# Altium PCB Mach_IO.PcbDoc (part 1 of 2)
Units mil, origin at the board's own origin, x right, y up, seen from the top; angles counter-clockwise.
Board outline 4965 x 4380 mil, 4 copper layers (Top Layer, Int1 (GND), Int2 (PWR), Bottom Layer), stack 53.912 mil thick; 148 components, 136 nets, 543 pads, 238 vias.
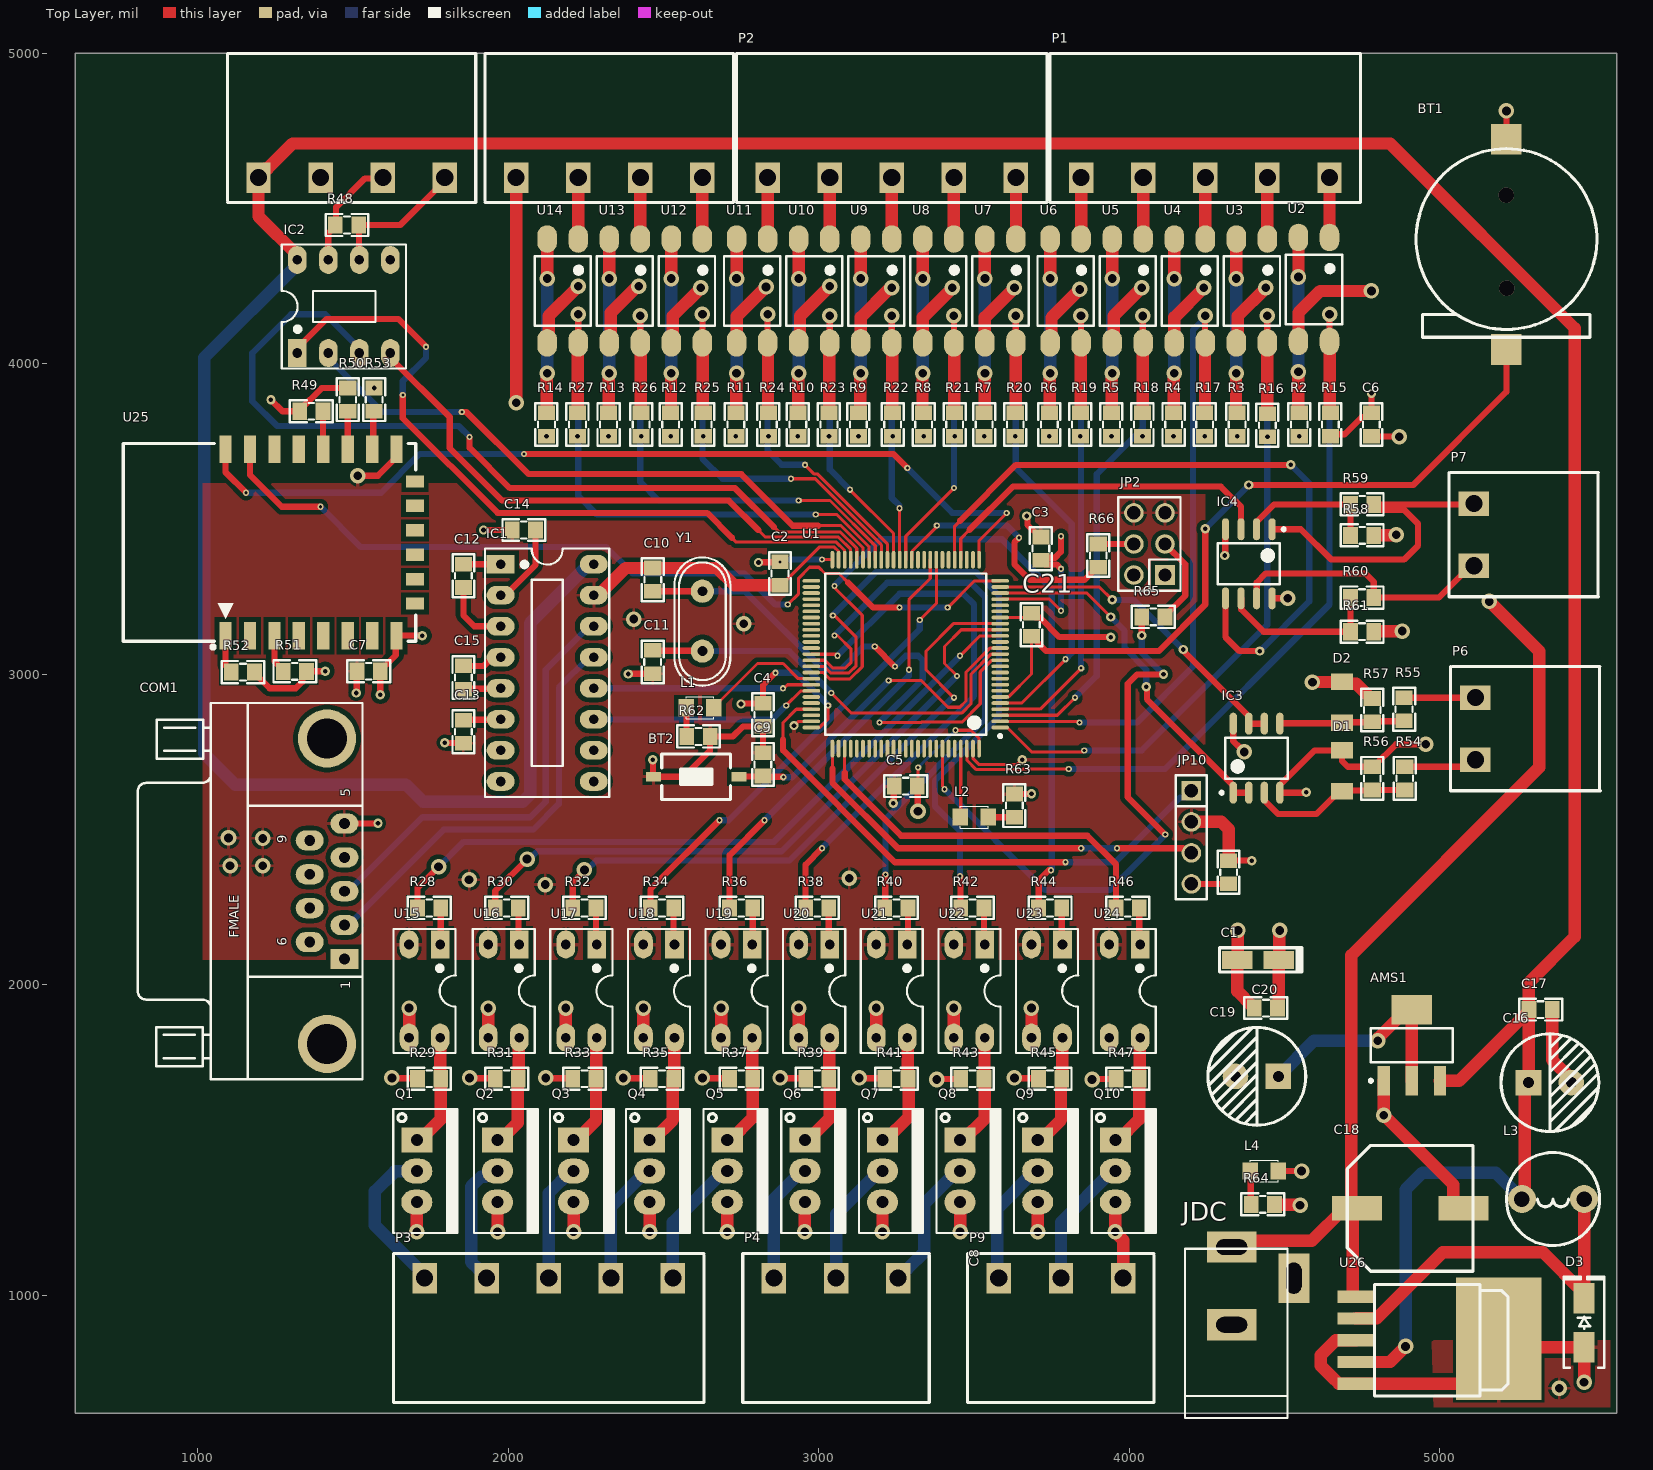
[diagram p0: Top Layer view]
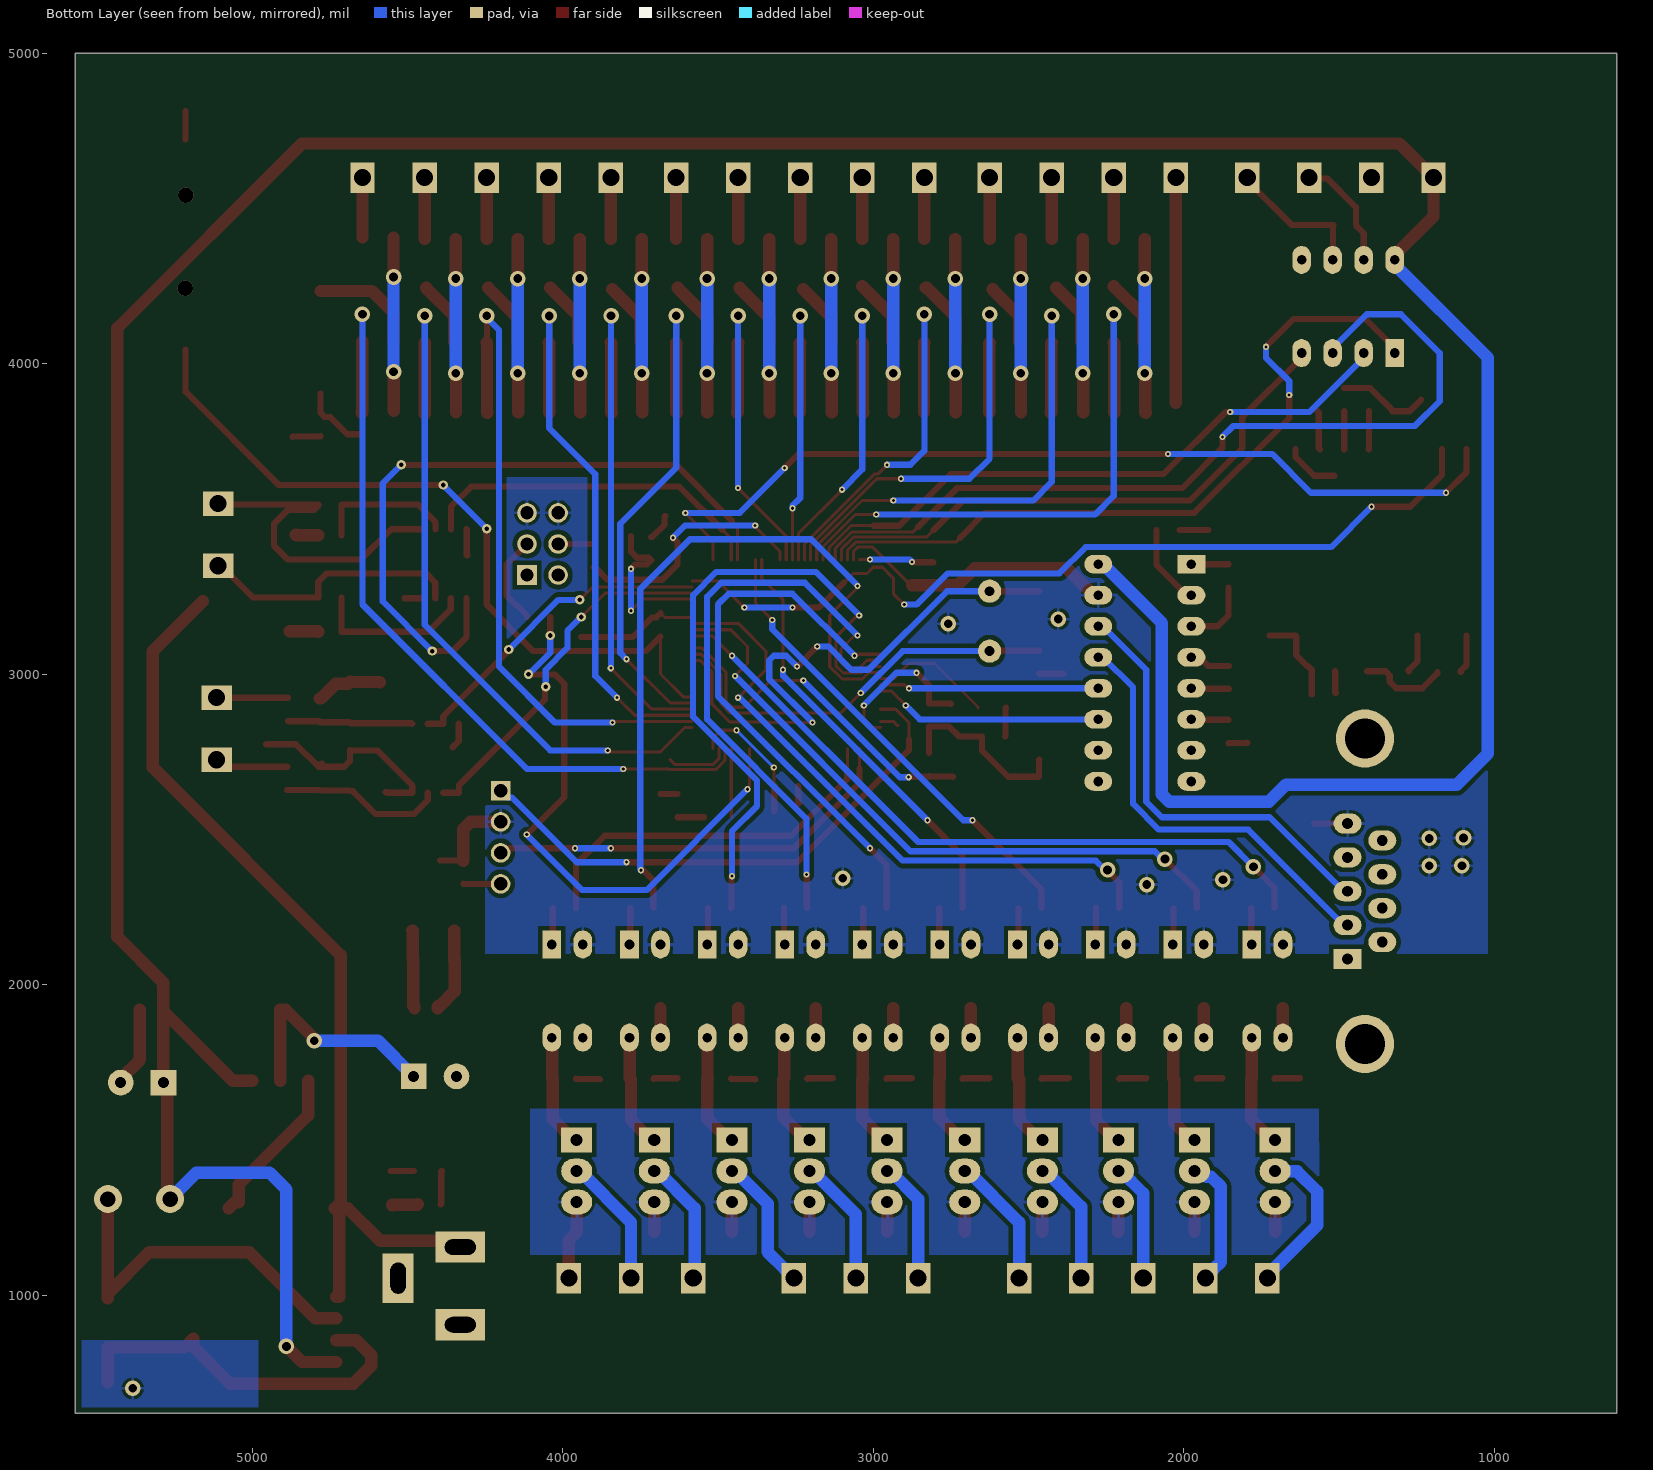
[diagram p1: Bottom Layer view, seen from below]
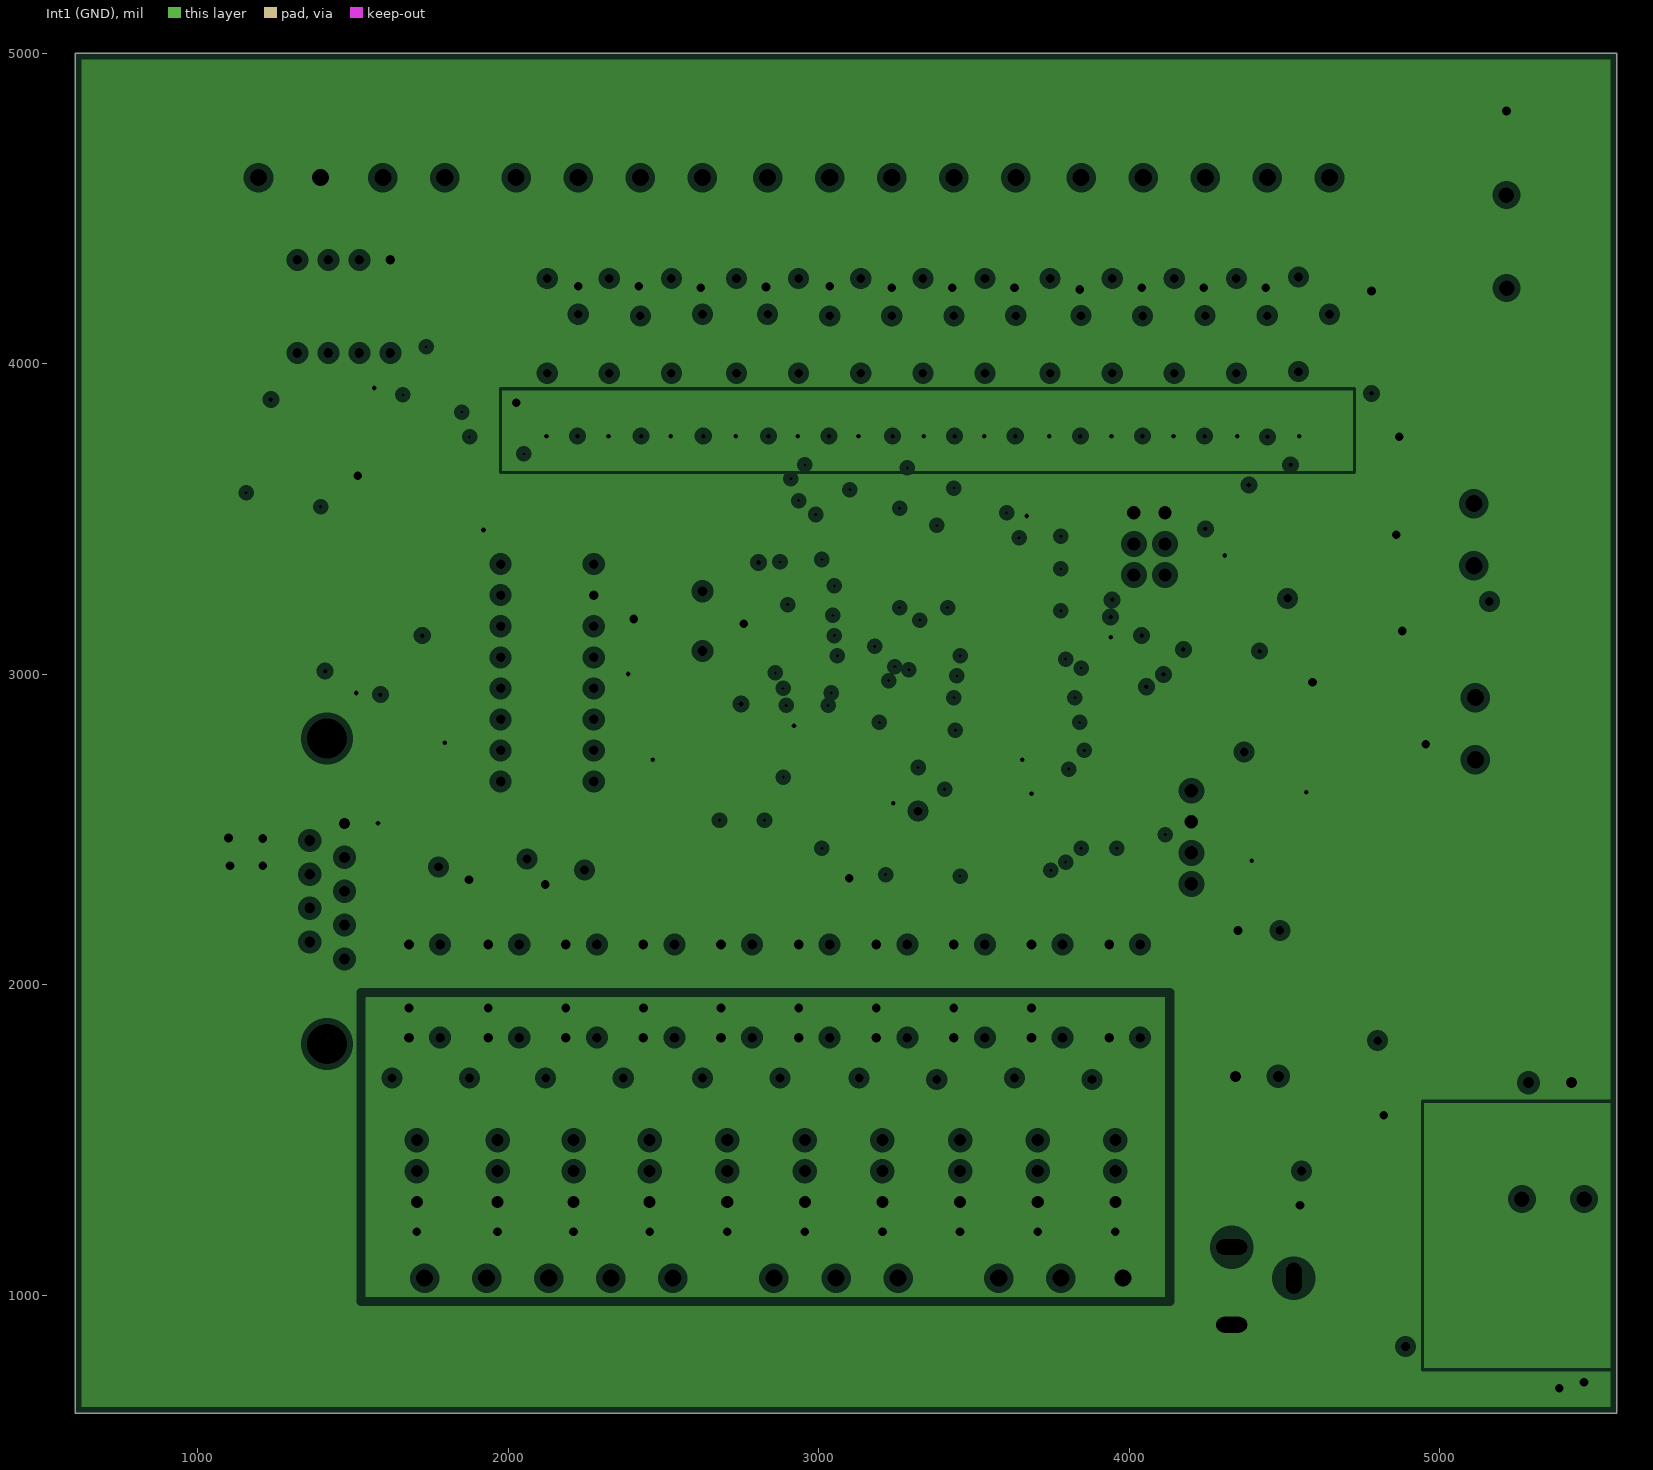
[diagram p2: Int1 (GND), clearances drawn from the general rule]
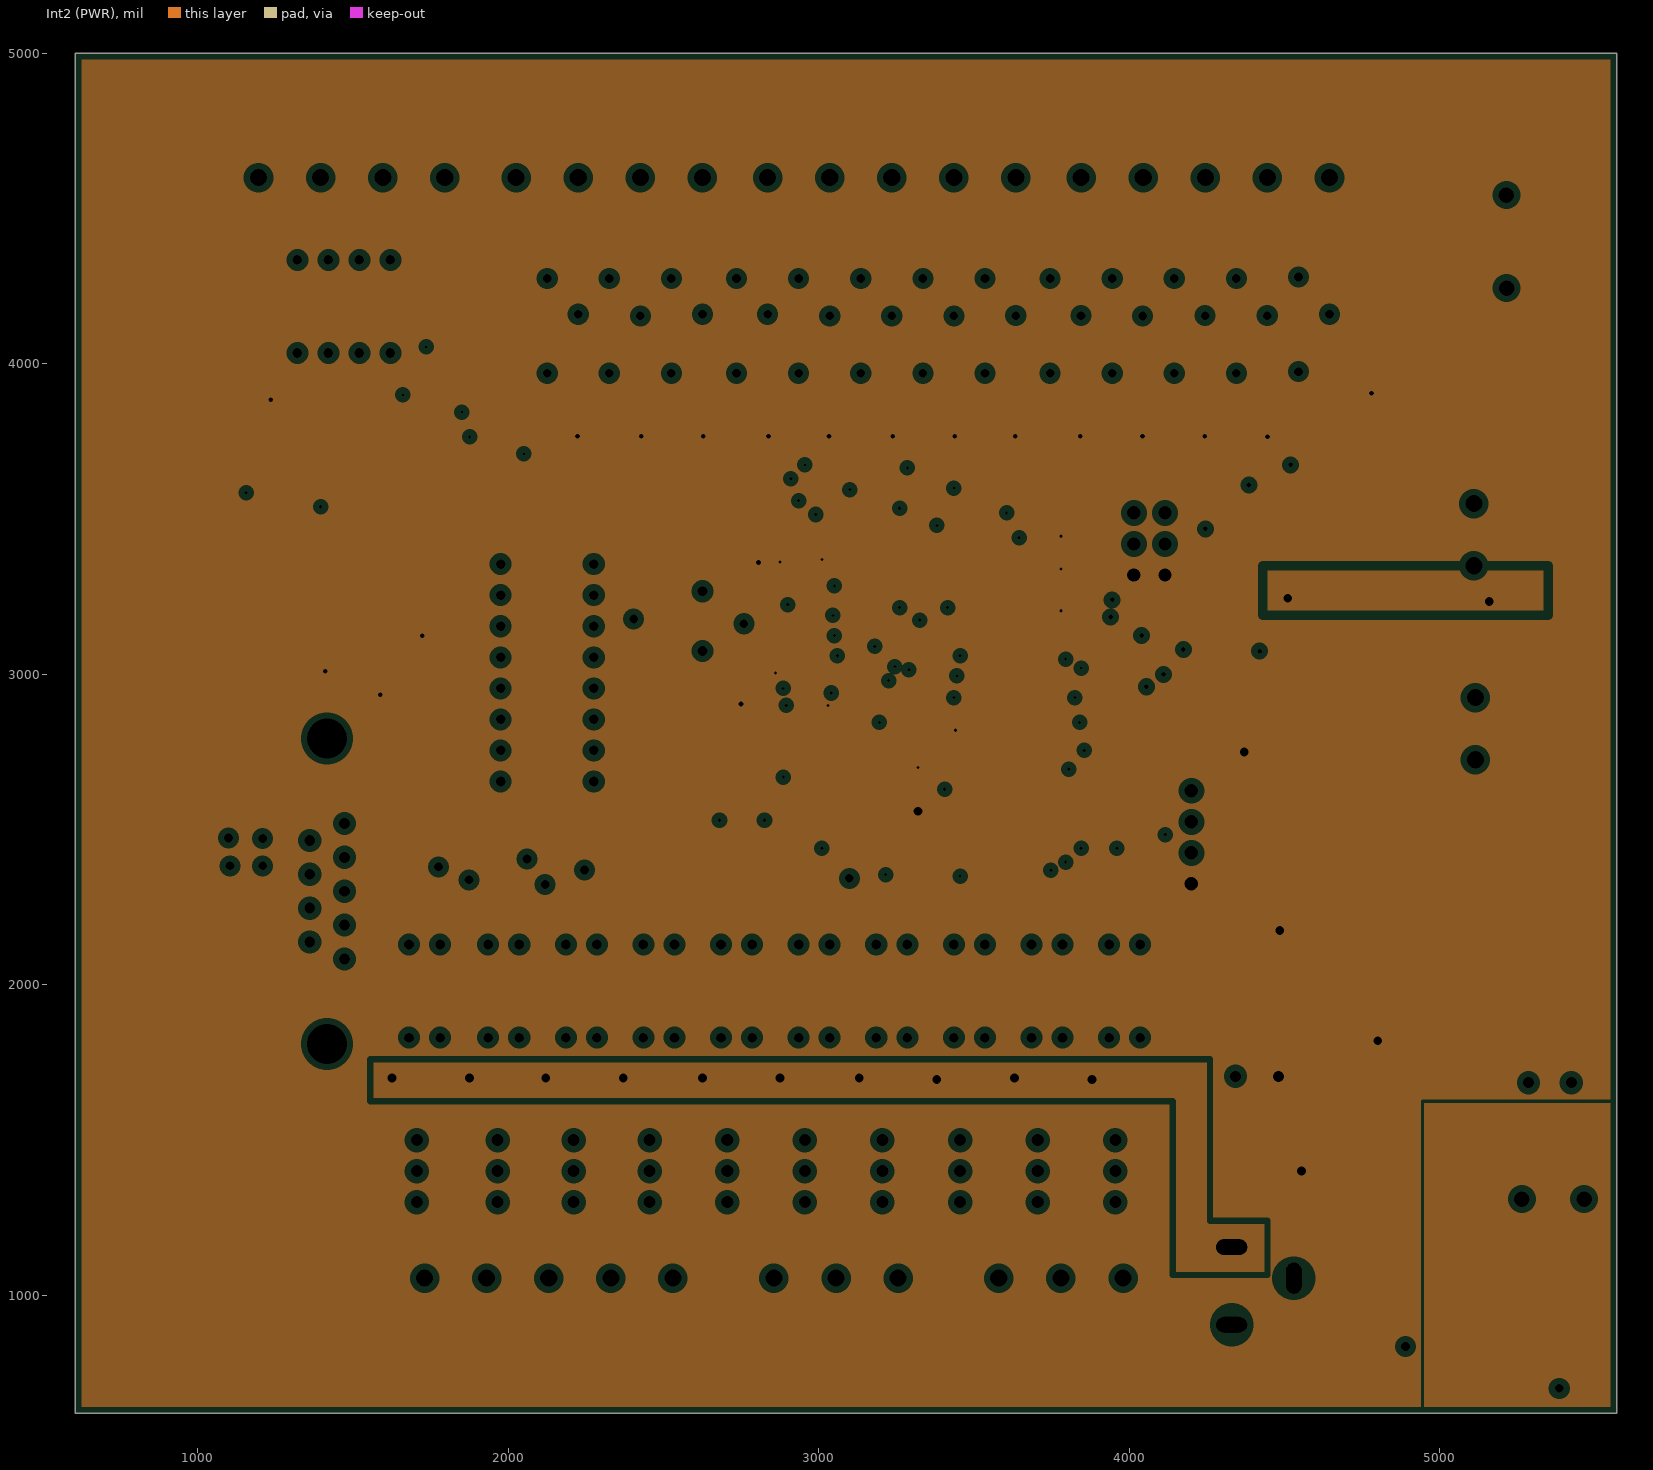
[diagram p3: Int2 (PWR), clearances drawn from the general rule]

## Layer stack, top to bottom
Top Solder: solder mask 1, SM-001, Dk 4
Top Layer: signal copper 1.378
Dielectric 1: prepreg 5.1, PP-017, Dk 4.3
Dielectric 2: prepreg 5.1, PP-017, Dk 4.3
Int1 (GND): plane copper 1.378, net (Multiple Nets)
Dielectric 3: core 28, Core-039, Dk 4.8
Int2 (PWR): plane copper 1.378, net (Multiple Nets)
Dielectric 4: prepreg 5.1, PP-017, Dk 4.3
Dielectric 5: prepreg 5.1, PP-017, Dk 4.3
Bottom Layer: signal copper 1.378
Bottom Solder: solder mask 1, SM-001, Dk 4

## Board outline
605,620 5570,620 5570,5000 605,5000

## Design rules (kind name [scope] priority, off if disabled: settings)
Clearance polygon [InPolygon] p1: gap=15 ignorepadtopadclearanceinfootprint=FALSE
Clearance Clearance_2 [InNet('24V')] p2: gap=20 ignorepadtopadclearanceinfootprint=FALSE
Clearance Clearance_1 [InNet('5V')] p3: gap=10 ignorepadtopadclearanceinfootprint=FALSE
Clearance [All] p4: gap=6 ignorepadtopadclearanceinfootprint=FALSE
DiffPairsRouting [All] p1: maxlimit=5 minlimit=5 mostfreqgap=5 toplayer_minwidth=85.07 toplayer_maxwidth=85.07 toplayer_prefwidth=85.07 bottomlayer_minwidth=85.07 bottomlayer_maxwidth=85.07 bottomlayer_prefwidth=85.07 impedanceprofiledriven=TRUE impedanceprofileid={BD4F8BAC-E991-4E81-AAFB-73A4E41C6E87} impedanceprofilevalue=30.000000 maxuncoupledlength=500
HoleSize [All] p1: absolutevalues=TRUE maxlimit=200 minlimit=1 maxpercent=80.000 minpercent=20.000
MinimumSolderMaskSliver [All] p1: minsoldermaskwidth=4
PlaneClearance [All] p1: clearance=20
PlaneConnect [All] p1: planeconnectstyle=Relief reliefexpansion=20 reliefentries=4 reliefconductorwidth=10 reliefairgap=10
PolygonConnect [All] p1: connectstyle=Relief reliefconductorwidth=10 reliefentries=4 polygonreliefangle="90 Angle" airgapwidth=10
RoutingVias [InDifferentialPairClass('All Differential Pairs')] p1: holewidth=28 width=50 viastyle="Through Hole" minholewidth=28 minwidth=50 maxholewidth=28 maxwidth=50
SilkToSilkClearance [All] p1: silktosilkclearance=0
SilkToSolderMaskClearance [IsPad] p1: minsilkscreentomaskgap=0 clearancetoexposedcopper=TRUE
SolderMaskExpansion [All] p1: expansion=4 istentingtop=FALSE
Width Width_1 [InNet('5V')] p1: maxlimit=60 minlimit=20 preferedwidth=40
Width [All] p2: maxlimit=40 minlimit=10 preferedwidth=20
23 further rules are at their usual default settings.

## Classes and differential pairs
component class U_RS485: IC2 R48
component class U_RS232: C12 C13 C14 C15 COM1 IC1
component class U_Regulator: AMS1 C16 C17 C18 C19 C20 D3 JDC L3 L4 R64 U26
component class U_esp8266: R49 R50 R51 R52 R53 U25
component class U_D_output: P3 P4 P9 Q1 Q2 Q3 Q4 Q5 Q6 Q7 Q8 Q9 Q10 R28 R29 R30 R31 R32 R33 R34 R35 R36 R37 R38 R39 R40 R41 R42 R43 R44 R45 R46 R47 U15 U16 U17 U18 U19 U20 U21 U22 U23 U24
component class U_D_Input: P1 P2 R2 R3 R4 R5 R6 R7 R8 R9 R10 R11 R12 R13 R14 R15 R16 R17 R18 R19 R20 R21 R22 R23 R24 R25 R26 R27 U2 U3 U4 U5 U6 U7 U8 U9 U10 U11 U12 U13 U14
component class U_A_output: IC4 P7 R58 R59 R60 R61
component class U_A_Input: D1 D2 IC3 P6 R54 R55 R56 R57
component class Mach_IO: BT1 BT2 C1 C2 C3 C4 C5 C6 C7 C8 C9 C10 C11 C21 JP2 JP10 L1 L2 R62 R63 R65 R66 U1 Y1

## Components (designator, comment, footprint, x,y, rotation, side; value= is the part's Value field where it differs from the comment)
AMS1 "AMS1117-3.3V" SOT223 4910,1805 r0 top value="AMS1117-3.3V SOT223"
BT1 "CR1220 SMD" "DE PIN CR1220" 5215,4385 r0 top
BT2 "Nut Nhan 2 Chan SMD 3x6x2.5" "Nut Nhan 2 Chan SMD 3x6x2.5" 2605,2670 r0 top
C1 "10uF" "tu tantalum smd3216" 4415,2080 r180 top
C2 "104" "tu 0805" 2875,3325 r270 top
C3 "104" "tu 0805" 3715,3405 r90 top
C4 "104" "tu 0805" 2820,2870 r270 top
C5 "104" "tu 0805" 3280,2640 r180 top
C6 "104" "tu 0805" 4780,3805 r270 top
C7 "104" "tu 0805" 1550,3010 r180 top
C8 "104" "tu 0805" 4319.87,2362.43 r90 top
C9 "104" "tu 0805" 2820,2710 r270 top
C10 "22pF" "tu 0805" 2465,3305 r90 top
C11 "22pF" "tu 0805" 2465,3040 r270 top
C12 "104" "tu 0805" 1855.13,3317.57 r270 top
C13 "104" "tu 0805" 1855,2815 r90 top
C14 "104" "tu 0805" 2050,3465 r180 top
C15 "104" "tu 0805" 1855,2990 r270 top
C16 "470uF" "tu hoa 8mm" 5355,1685 r0 top
C17 "106" "tu 0805" 5325,1920 r180 top
C18 "330uF" "tu nhom 10 (g)" 4905,1280 r0 top
C19 "470uF" "tu hoa 8mm" 4411.1,1705 r180 top
C20 "106" "tu 0805" 4440,1925 r0 top
C21 "104" "tu 0805" 3685,3160 r270 top
COM1 "COM 9 FMALE" "DSB 9-F" 1415.91,2301.42 r90 top value="COM 9"
D1 "3.3V" "DIODE ZENNER SMD SOD80" 4685,2690 r90 top
D2 "3.3V" "DIODE ZENNER SMD SOD80" 4685,2910 r90 top
D3 "SS34" "DIODE SMA" 5465,911.26 r90 top
IC1 "MAX232" DIP16/W0.3 1975,3355 r270 top
IC2 "MAX485" DIP8/W0.3 1320,4035 r0 top
IC3 "LM358 SOP8" "SOP 8" 4410,2730 r90 top
IC4 "LM358 SOP8" "SOP 8" 4385,3356.22 r270 top
JDC "Jac DC" DC-IN 4430,1030 r90 top
JP2 "JP 2x3 2.54" "JP 2x3 DT" 4065,3420 r90 top
JP10 "JP 1x4 2.54" "JP 1x4 DT" 4200,2625 r270 top
L1 "LED 0805" LED-0805-Red 2662.23,2892.39 r180 top
L2 "LED 0805" LED-0805-Green 3455,2540 r0 top
L3 "100uH 3A" "CUON CAM 100uH3A" 5365,1310 r180 top
L4 "LED 0805" LED-0805-Orange 4480,1400 r180 top
P1 "CON 5 EDG5.08" "CON 5 5EDG5.08" 3845,4600 r0 top
P2 "CON 5 EDG5.08" "CON 5 5EDG5.08" 2835,4600 r0 top
P3 "CON 5 EDG5.08" "CON 5 5EDG5.08" 2530,1055 r180 top
P4 "CON 3 EDG5.08" "CON 3 3EDG5.08" 3255.5,1055 r180 top
P6 "CON 2 EDG5.08" "CON 2 2EDG5.08" 5115,2925 r270 top
P7 "CON 2 EDG5.08" "CON 2 2EDG5.08" 5110,3550 r270 top
P9 "CON 3 EDG5.08" "CON 3 3EDG5.08" 3980,1055 r180 top
Q1 "IRFZ44" TO220 1705,1500 r270 top
Q2 "IRFZ44" TO220 1965,1500 r270 top
Q3 "IRFZ44" TO220 2210,1500 r270 top
Q4 "IRFZ44" TO220 2455,1500 r270 top
Q5 "IRFZ44" TO220 2705,1500 r270 top
Q6 "IRFZ44" TO220 2955,1500 r270 top
Q7 "IRFZ44" TO220 3205,1500 r270 top
Q8 "IRFZ44" TO220 3455,1500 r270 top
Q9 "IRFZ44" TO220 3705,1500 r270 top
Q10 "IRFZ44" TO220 3955,1500 r270 top
R2 "10k" "tro smd 0805" 4550,3805 r270 top
R3 "10k" "tro smd 0805" 4350,3805 r270 top
R4 "10k" "tro smd 0805" 4145,3805 r270 top
R5 "10k" "tro smd 0805" 3945,3805 r270 top
R6 "10k" "tro smd 0805" 3745,3805 r270 top
R7 "10k" "tro smd 0805" 3535,3805 r270 top
R8 "10k" "tro smd 0805" 3340,3805 r270 top
R9 "10k" "tro smd 0805" 3130,3805 r270 top
R10 "10k" "tro smd 0805" 2935,3805 r270 top
R11 "10k" "tro smd 0805" 2735,3805 r270 top
R12 "10k" "tro smd 0805" 2525,3805 r270 top
R13 "10k" "tro smd 0805" 2325,3805 r270 top
R14 "10k" "tro smd 0805" 2125,3805 r270 top
R15 "10k" "tro smd 0805" 4650,3805 r270 top
R16 "10k" "tro smd 0805" 4447.39,3802.57 r270 top
R17 "10k" "tro smd 0805" 4245,3805 r270 top
R18 "10k" "tro smd 0805" 4045,3805 r270 top
R19 "10k" "tro smd 0805" 3845,3805 r270 top
R20 "10k" "tro smd 0805" 3635,3805 r270 top
R21 "10k" "tro smd 0805" 3440,3805 r270 top
R22 "10k" "tro smd 0805" 3240,3805 r270 top
R23 "10k" "tro smd 0805" 3035,3805 r270 top
R24 "10k" "tro smd 0805" 2840,3805 r270 top
R25 "10k" "tro smd 0805" 2630,3805 r270 top
R26 "10k" "tro smd 0805" 2430,3805 r270 top
R27 "10k" "tro smd 0805" 2225,3805 r270 top
R28 "680R" "tro smd 0805" 1745,2245 r180 top
R29 "10k" "tro smd 0805" 1745,1695 r180 top
R30 "680R" "tro smd 0805" 1995,2245 r180 top
R31 "10k" "tro smd 0805" 1995,1695 r180 top
R32 "680R" "tro smd 0805" 2245,2245 r180 top
R33 "10k" "tro smd 0805" 2245,1695 r180 top
R34 "680R" "tro smd 0805" 2495,2245 r180 top
R35 "10k" "tro smd 0805" 2495,1695 r180 top
R36 "680R" "tro smd 0805" 2750,2245 r180 top
R37 "10k" "tro smd 0805" 2750,1695 r180 top
R38 "680R" "tro smd 0805" 2995,2245 r180 top
R39 "10k" "tro smd 0805" 2995,1695 r180 top
R40 "680R" "tro smd 0805" 3250,2245 r180 top
R41 "10k" "tro smd 0805" 3250,1695 r180 top
R42 "680R" "tro smd 0805" 3495,2245 r180 top
R43 "10k" "tro smd 0805" 3495,1695 r180 top
R44 "680R" "tro smd 0805" 3745,2245 r180 top
R45 "10k" "tro smd 0805" 3745,1695 r180 top
R46 "680R" "tro smd 0805" 3995,2245 r180 top
R47 "10k" "tro smd 0805" 3995,1695 r180 top
R48 "120R" "tro smd 0805" 1480,4450 r0 top
R49 "10k" "tro smd 0805" 1365,3850 r0 top
R50 "10k" "tro smd 0805" 1485,3885 r270 top
R51 "10k" "tro smd 0805" 1312.23,3007.39 r180 top
R52 "10k" "tro smd 0805" 1145,3005 r180 top
R53 "10k" "tro smd 0805" 1570,3885 r270 top
R54 "10k" "tro smd 0805" 4885,2665 r90 top
R55 "10k" "tro smd 0805" 4882.61,2887.43 r90 top
R56 "4.7k" "tro smd 0805" 4785,2665 r270 top
R57 "4.7k" "tro smd 0805" 4785,2885 r270 top
R58 "10k" "tro smd 0805" 4750,3450 r0 top
R59 "20k" "tro smd 0805" 4750,3550 r0 top
R60 "20k" "tro smd 0805" 4750,3245 r180 top
R61 "10k" "tro smd 0805" 4750,3135 r180 top
R62 "100R" "tro smd 0805" 2612.23,2802.39 r0 top
R63 "100R" "tro smd 0805" 3627.61,2577.23 r90 top
R64 "100R" "tro smd 0805" 4430,1295 r0 top
R65 "10k" "tro smd 0805" 4077.43,3187.39 r0 top
R66 "10k" "tro smd 0805" 3902.39,3382.77 r270 top
U1 "STM32F100xx_LQFP100" STM32_LQFP100 3280,3065 r180 top
U2 "OPTO PC817 SMD" SOP4 4595,4240 r270 top value=PC817
U3 "OPTO PC817 SMD" SOP4 4395,4235 r270 top value=PC817
U4 "OPTO PC817 SMD" SOP4 4195,4235 r270 top value=PC817
U5 "OPTO PC817 SMD" SOP4 3995,4235 r270 top value=PC817
U6 "OPTO PC817 SMD" SOP4 3795,4235 r270 top value=PC817
U7 "OPTO PC817 SMD" SOP4 3585,4235 r270 top value=PC817
U8 "OPTO PC817 SMD" SOP4 3385,4235 r270 top value=PC817
U9 "OPTO PC817 SMD" SOP4 3185,4235 r270 top value=PC817
U10 "OPTO PC817 SMD" SOP4 2985,4235 r270 top value=PC817
U11 "OPTO PC817 SMD" SOP4 2785,4235 r270 top value=PC817
U12 "OPTO PC817 SMD" SOP4 2575,4235 r270 top value=PC817
U13 "OPTO PC817 SMD" SOP4 2375,4235 r270 top value=PC817
U14 "OPTO PC817 SMD" SOP4 2175,4235 r270 top value=PC817
U15 "OPTO PC817 DIP4" DIP4 1780,2132.52 r180 top value=PC817
U16 "OPTO PC817 DIP4" DIP4 2035,2132.52 r180 top value=PC817
U17 "OPTO PC817 DIP4" DIP4 2285,2132.52 r180 top value=PC817
U18 "OPTO PC817 DIP4" DIP4 2535,2132.52 r180 top value=PC817
U19 "OPTO PC817 DIP4" DIP4 2785,2132.52 r180 top value=PC817
U20 "OPTO PC817 DIP4" DIP4 3035,2132.52 r180 top value=PC817
U21 "OPTO PC817 DIP4" DIP4 3285,2132.52 r180 top value=PC817
U22 "OPTO PC817 DIP4" DIP4 3535,2132.52 r180 top value=PC817
U23 "OPTO PC817 DIP4" DIP4 3785,2132.52 r180 top value=PC817
U24 "OPTO PC817 DIP4" DIP4 4035,2132.52 r180 top value=PC817
U25 "ESP8266 12" "ESP8266 12" 1088.78,3109.84 r90 top
U26 "LM2576HVS 5.0V SMD" TO263-5 4960,855 r270 top
Y1 "16Mhz" "Thach Anh 2 chan cam" 2625,3171.46 r90 top value=4Mhz

## Footprints (in the part's own frame and the unit in brackets; to place one, negate y for a bottom-side part, rotate by r counter-clockwise, add the part's x,y. Pads: shape width x height; smd on the part's side, far side on the other; paste and mask are expansions set on the pad)
"CON 2 2EDG5.08" [mm]
  rect 2x2.5 hole 1.4: 1(0,0) 2(5.08,0)
  silkscreen extent -2.54,-2.03 7.62,10.21, body extent -2.5,-1.75 7.58,10.25, height 3.15
"CON 3 3EDG5.08" [mm]
  rect 2x2.5 hole 1.4: 1(0,0) 2(5.08,0) 3(10.173,0)
  silkscreen extent -2.54,-2.03 12.71,10.16, body extent -2.5,-1.75 12.67,10.25, height 3.15
"CON 5 5EDG5.08" [mm]
  rect 2x2.5 hole 1.4: 1(0,0) 2(5.08,0) 3(10.16,0) 4(15.24,0) 5(20.32,0)
  silkscreen extent -2.54,-2.03 22.86,10.16, body extent -2.5,-1.75 22.82,10.25, height 3.15
"CUON CAM 100uH3A" [mil] "100uH3A"
  round 90 hole 50: 1(-100,0) 2(100,0)
  silkscreen extent -150,-150 150,150, body extent -171,-175 171,167, height 394
DC-IN [mil] "Jac DC input"
  rect 100x160 hole 50 slot 100 at 90 deg: 1(125,100) 2(-125,100)
  rect 160x100 hole 50 slot 100 at 0 deg: 3(25,-100)
  silkscreen extent -425,-80 120,250, body extent -410,-105 134,269, height 434
"DE PIN CR1220" [mm]
  rect 2.5x2.5 smd: 1(0,-8.6) 2(0,8.6)
  silkscreen extent -7.39,-7.6 7.4,7.84, body extent -7.39,-9.42 7.36,9.38, height 4.27
"DIODE SMA" [mm] "SMA"
  rect 2.5x1.7 smd: 1(-2,0) 2(2,0)
  silkscreen extent -3.68,-1.65 3.75,1.65, body extent -2.6,-1.37 2.6,1.37, height 2.4
"DIODE ZENNER SMD SOD80" [mm] "SOD80"
  rect 1.35x1.8 smd: 1(1.675,0) 2(-1.675,0)
  body extent -1.75,-0.76 1.75,0.74, height 1.45
DIP4 [mil] "W.300/L.400"
  rect 60x90 hole 31: 1(0,2.52)
  oval 60x90 hole 31: 2(100,2.52) 3(100,302.52) 4(0,302.52)
  silkscreen extent -50,-47 150,353, body extent -59,-7 159,307, height 170
DIP8/W0.3 [mil] "8 PIN, W 300mil, Pin to pin 100mil"
  rect 60x90 hole 31: 1(0,0)
  oval 60x90 hole 31: 2(100,0) 3(200,0) 4(300,0) 5(300,300) 6(200,300) 7(100,300) 8(0,300)
  silkscreen extent -50,-50 350,350, body extent -50,-40 350,336, height 201
DIP16/W0.3 [mil] "16 PIN, W 300mil, Pin to pin 100mil"
  rect 60x90 hole 31: 1(0,0)
  oval 60x90 hole 31: 2(100,0) 3(200,0) 4(300,0) 5(400,0) 6(500,0) 7(600,0) 8(700,0) 9(700,300) 10(600,300) 11(500,300) 12(400,300) 13(300,300) 14(200,300) 15(100,300) 16(0,300)
  silkscreen extent -50,-50 750,350, body extent -52,-57 752,356, height 299
"DSB 9-F" [mil] "COM FMALE - D Subminiature; 9 Position; Right Angle; Pitch 1.385 mm"
  rect 65x90 hole 35: 1(-218.11,-55.91)
  oval 65x90 hole 35: 2(-109.05,-55.91) 3(0,-55.91) 4(109.06,-55.91) 5(218.11,-55.91) 6(-163.58,55.91) 7(-54.53,55.91) 8(54.53,55.91) 9(163.58,55.91)
  round 187.4 hole 128.35: 10(-491.93,0) 11(491.93,0)
  silkscreen extent -606,-114 606,610, body extent -604,-138 608,613, height 495
"ESP8266 12" [mm] "ESP-12 Wi-Fi Module by AI-Thinker"
  rect 2.25x1 smd: 1(0.375,0) 2(0.375,-2) 3(0.375,-4) 4(0.375,-6) 5(0.375,-8) 6(0.375,-10) 7(0.375,-12) 8(0.375,-14) 15(15.625,-14) 16(15.625,-12) 17(15.625,-10) 18(15.625,-8) 19(15.625,-6) 20(15.625,-4) 21(15.625,-2) 22(15.625,0)
  rect 1x1.5 smd: 9(3,-15.5) 10(5,-15.5) 11(7,-15.5) 12(9,-15.5) 13(11,-15.5) 14(13,-15.5)
  silkscreen extent -0.7,-15.57 16.08,8.37, body extent 0,-15.49 16,8.51, height 2.75
"JP 1x4 DT" [mm] "4 pins, 1 row, straight, gold plating"
  rect 1.6x1.6 hole 1.1: 1(0,0)
  round 1.6 hole 1.1: 2(2.54,0) 3(5.08,0) 4(7.62,0)
  silkscreen extent -1.27,-1.27 8.89,1.27, body extent -1.27,-1.27 8.89,1.27, height 8.54
"JP 2x3 DT" [mm]
  rect 1.6x1.6 hole 1.1: 1(-2.54,-1.27)
  round 1.6 hole 1.1: 2(0,-1.27) 3(2.54,-1.27) 4(2.54,1.27) 5(0,1.27) 6(-2.54,1.27)
  silkscreen extent -3.81,-2.54 3.81,2.54, body extent -3.81,-2.54 3.81,2.54, height 8.55
LED-0805-Green [mil]
  rect 50x55 smd: 1(0,0) 2(90,0)
  silkscreen extent 0,-35 90,35, body extent 5,-25 85,25, height 43
LED-0805-Orange [mil]
  rect 50x55 smd: 1(0,0) 2(90,0)
  silkscreen extent 0,-35 90,35, body extent 5,-25 85,25, height 43
LED-0805-Red [mil]
  rect 50x55 smd: 1(0,0) 2(90,0)
  silkscreen extent 0,-35 90,35, body extent 5,-25 85,25, height 43
"Nut Nhan 2 Chan SMD 3x6x2.5" [mm] "Switch SMD type"
  rect 1.2x0.8 smd: 1(-3.5,0) 2(3.5,0)
  silkscreen extent -2.82,-1.85 2.82,1.85, body extent -3.05,-1.85 3.05,1.85, height 2.5
SOP4 [mm]
  oval 2.25x1.6 smd: 1(-4.25,1.27) 2(-4.25,-1.27) 3(4.25,-1.27) 4(4.25,1.27)
  silkscreen extent -2.85,-2.3 2.85,2.3, body extent -4.67,-2.29 4.93,2.31, height 3.6
"SOP 8" [mm] "SOIC, 8-Leads, Body 4.9x3.9mm, Pitch 1.27mm, IPC High Density"
  oval 1.8x0.6 smd: 1(-2.825,1.905) 2(-2.825,0.635) 3(-2.825,-0.635) 4(-2.825,-1.905) 5(2.825,-1.905) 6(2.825,-0.635) 7(2.825,0.635) 8(2.825,1.905)
  silkscreen extent -2.95,-2.55 1.68,2.98, body extent -2.99,-2.45 3,2.45, height 1.6
SOT223 [mm]
  rect 1x2.4 smd: 1(-2.3,-2.9) 2(0,-2.9) 3(2.3,-2.9)
  rect 3.3x2.4 smd: 4(0,2.9)
  silkscreen extent -3.47,-3.02 3.35,1.4, body extent -3.25,-3.56 3.25,3.4, height 1.68
STM32_LQFP100 [mm] "TSQFP, 100-Leads, Body 14.00x14.00mm, Pitch 0.50mm, IPC Medium Density"
  oval 1.45x0.3 smd: 1(-7.725,6) 2(-7.725,5.5) 3(-7.725,5) 4(-7.725,4.5) 5(-7.725,4) 6(-7.725,3.5) 7(-7.725,3) 8(-7.725,2.5) 9(-7.725,2) 10(-7.725,1.5) 11(-7.725,1) 12(-7.725,0.5) 13(-7.725,0) 14(-7.725,-0.5) 15(-7.725,-1) 16(-7.725,-1.5) 17(-7.725,-2) 18(-7.725,-2.5) 19(-7.725,-3) 20(-7.725,-3.5) 21(-7.725,-4) 22(-7.725,-4.5) 23(-7.725,-5) 24(-7.725,-5.5) 25(-7.725,-6) 51(7.725,-6) 52(7.725,-5.5) 53(7.725,-5) 54(7.725,-4.5) 55(7.725,-4) 56(7.725,-3.5) 57(7.725,-3) 58(7.725,-2.5) 59(7.725,-2) 60(7.725,-1.5) 61(7.725,-1) 62(7.725,-0.5) 63(7.725,0) 64(7.725,0.5) 65(7.725,1) 66(7.725,1.5) 67(7.725,2) 68(7.725,2.5) 69(7.725,3) 70(7.725,3.5) 71(7.725,4) 72(7.725,4.5) 73(7.725,5) 74(7.725,5.5) 75(7.725,6)
  oval 0.3x1.45 smd: 26(-6,-7.725) 27(-5.5,-7.725) 28(-5,-7.725) 29(-4.5,-7.725) 30(-4,-7.725) 31(-3.5,-7.725) 32(-3,-7.725) 33(-2.5,-7.725) 34(-2,-7.725) 35(-1.5,-7.725) 36(-1,-7.725) 37(-0.5,-7.725) 38(0,-7.725) 39(0.5,-7.725) 40(1,-7.725) 41(1.5,-7.725) 42(2,-7.725) 43(2.5,-7.725) 44(3,-7.725) 45(3.5,-7.725) 46(4,-7.725) 47(4.5,-7.725) 48(5,-7.725) 49(5.5,-7.725) 50(6,-7.725) 76(6,7.725) 77(5.5,7.725) 78(5,7.725) 79(4.5,7.725) 80(4,7.725) 81(3.5,7.725) 82(3,7.725) 83(2.5,7.725) 84(2,7.725) 85(1.5,7.725) 86(1,7.725) 87(0.5,7.725) 88(0,7.725) 89(-0.5,7.725) 90(-1,7.725) 91(-1.5,7.725) 92(-2,7.725) 93(-2.5,7.725) 94(-3,7.725) 95(-3.5,7.725) 96(-4,7.725) 97(-4.5,7.725) 98(-5,7.725) 99(-5.5,7.725) 100(-6,7.725)
  silkscreen extent -7.85,-6.6 6.6,6.82, body extent -8,-8 8,8, height 1.6
"Thach Anh 2 chan cam" [mm]
  round 1.905 hole 0.8: 1(-2.45,0) 2(2.45,0)
  silkscreen extent -5.28,-2.29 5.21,2.29, body extent -5.68,-2.36 5.68,2.29, height 3.5
TO220 [mil] "TO-220"
  rect 80x100 hole 39: 1(0,0)
  oval 80x100 hole 39: 2(100,0) 3(200,0)
  silkscreen extent -100,-76 300,130, body extent -95,-80 295,97, height 323
TO263-5 [mil] "TO263-5"
  rect 39.37x120 smd: 1(-140,-230) 2(-70,-230) 3(0,-230) 4(70,-230) 5(140,-230)
  rect 393.7x275.59 smd: 6(-5,230)
  silkscreen extent -180,-170 180,260, body extent -200,-242 200,310, height 180
"tro smd 0805" [mm]
  rect 1.2x1.4 smd: 1(-0.946,-0.061) 2(0.954,-0.061)
  silkscreen extent -1.75,-0.97 1.75,0.84, body extent -1.56,-0.76 1.44,0.64, height 0.53
"tu 0805" [mm] "Compoment SMD 80x50mil"
  rect 1.2x1.4 smd: 1(-0.946,-0.003) 2(0.954,-0.003)
  silkscreen extent -1.75,-0.89 1.75,0.89, body extent -1.01,-0.64 1.01,0.63, height 0.61
"tu hoa 8mm" [mm]
  rect 2.1x2.1 hole 0.9: 1(-1.75,0)
  round 2.1 hole 0.9: 2(1.75,0)
  silkscreen extent -4,-4 4,4, body extent -4.1,-4.07 4.1,4.13, height 13.81
"tu nhom 10 (g)" [mm]
  rect 4.1x2 smd: 2(4.35,0) 24(-4.35,0)
  silkscreen extent -5.15,-5.15 5.15,5.15, body extent -5.9,-5.25 5.9,5.25, height 10.5
"tu tantalum smd3216" [mm]
  rect 2.5x1.5 smd: 1(-1.7,0) 2(1.7,0)
  silkscreen extent -3.61,-1 3.17,1, body extent -1.7,-0.9 1.7,0.9, height 1.69

## Part data
AMS1: library part "AMS1117 SMD", "Dán", Chung_Loai=Dán, Don_Vi=Con, Ma_Hang=MH000596
BT1: library part "De pin CR1220 SMD", Ma_Hang=MH000833, Ten="Đế PIN CR1220 SMD"
C1: library part "Tu tantalum 10uF 16V SMD3216", "Dán", Chung_Loai=Dán, Don_Vi=Con, Ma_Hang=MH001954, So_Chan=2, Ten_Linh_Kien="Tụ tantalum 106C-10uF 16V SMD3216"
C2 C3 C4 C5 C6 C7 C8 C9 C12 C13 C14 C15 C21: library part "Tu 0805 104 50V 10%", "Dán", Chung_Loai=Dán, Don_Vi=Con, Ma_Hang=MH004551, So_Chan=2, Ten_Linh_Kien="Tụ 0805 104-100nF 10% 50V"
C10 C11: library part "Tu 0805 22pF 50V 10%", "Dán", Chung_Loai=Dán, Don_Vi=Con, Ma_Hang=MH004560, So_Chan=2, Ten_Linh_Kien="Tụ 0805 22P 10% 50V"
C16 C19: library part "Tu Hoa 470uF 16V 8x11", "Cắm", Chung_Loai=Cắm, Don_Vi=Con, Ma_Hang=MH006550, So_Chan=2, Ten_Linh_Kien="Tụ Hóa 470uF 16V 8x11MM"
C17 C20: library part "Tu 0805 106 16V 10%", "Dán", Chung_Loai=Dán, Don_Vi=Con, Ma_Hang=MH004553, So_Chan=2, Ten_Linh_Kien="Tụ 0805 106-10uF 10% 16V"
C18: library part "Tu Nhom 330uF 35V", "Dán", Chung_Loai=Dán, Don_Vi=Con, Ma_Hang=MH004414, So_Chan=2, Ten_Linh_Kien="Tụ Nhôm 330uF 35V 10x10.5MM"
COM1: library part DSB9F, "COM 9", PackageDocument=O, DatasheetDocument=1-Sep-1999, Gender=Receptacle, LatestRevisionDate=17-Jul-2002, LatestRevisionNote="Re-released for DXP Platform.", Orientation="Right Angle", PackageReference=788750, Positions=9, Published=15-Jun-2001, Publisher="Altium Limited"
D1 D2: library part "Diode Zener 3.3V", "Dán", Chung_Loai=Dán, Don_Vi=Con, Ma_Hang=MH002880, Ten_Linh_Kien="Diode Zener 1/2W 3.3V SMD1206 ZMM3.3"
D3: library part "Diode SS34 ( 1N5822 )", "Dán", Chung_Loai=Dán, Don_Vi=Con, Ma_Hang=MH002104, Ten_Linh_Kien="Diode SS34 3A 40V SMA ( 1N5822 SS34A)"
IC1: "Dual EIA-232 Driver/Receiver"
IC2: "RS232 - RS485 (Same sn75176)"
IC3 IC4 U26: "Dán", Chung_Loai=Dán, Don_Vi=Con
  IC3 IC4: Ma_Hang=MH000609, Ten_Linh_Kien="LM358 SOP8"
  U26: Ma_Hang=MH002362, Ten_Linh_Kien="LM2576HVS-5.0V BUCK 5V 3A TO263-5"
JDC: library part DCIN, "Jac DC input"
JP2: library part "JP 2x3 2.54 Duc Thang", "Cắm", Chung_Loai=Cắm, Don_Vi=Con, Ma_Hang=MH002686, Ten_Linh_Kien="Jump Đôi Đực 2.54MM 2x40P Thẳng 11MM"
JP10: library part "JP 1x4 2.54 Duc Thang", "Cắm", Chung_Loai=Cắm, Don_Vi=Con, Ma_Hang=MH000903, Ten_Linh_Kien="Jump Đơn Đực 2.54MM 1x40P Thẳng 11MM"
L1: library part "LED 0805 Do", "Dán", Chung_Loai=Dán, Don_Vi=Con, Ma_Hang=MH000897, Ten_Linh_Kien="LED 0805 Màu Đỏ (Red)"
L2: library part "LED 0805 Xanh La", "Dán", Chung_Loai=Dán, Don_Vi=Con, Ma_Hang=MH002326, Ten_Linh_Kien="LED 0805 Màu Xanh Lá (Green)"
L3: library part "CUON CAM 100uH DIP", "Dán", Chung_Loai=Dán, Don_Vi=Con, Ma_Hang=MH002209, Ten_Linh_Kien="Cuộn Cảm 100uH 3A 8x10MM"
L4: library part "LED 0805 Cam", "Dán", Chung_Loai=Dán, Don_Vi=Con, Ma_Hang=MH002328, Ten_Linh_Kien="LED 0805 Màu Cam ( Orange)"
P1 P2 P3 P4 P6 P7 P9: "Cắm", Chung_Loai=Cắm, Don_Vi=Con
  P1 P2 P3: Ma_Hang=MH003589, Ten_Linh_Kien="CON 5 2EDG5.08-5P 5.08MM ( Xanh Cong)"
  P4 P9: Ma_Hang=MH000760, Ten_Linh_Kien="CON 3 2EDG5.08-3P 5.08MM ( Xanh Cong)"
  P6 P7: Ma_Hang=MH000759, Ten_Linh_Kien="CON 2 2EDG5.08-2P 5.08MM ( Xanh Cong)"
Q1 Q2 Q3 Q4 Q5 Q6 Q7 Q8 Q9 Q10: library part "FET IRFZ44 DIP", "TO-220"
R2 R3 R4 R5 R6 R7 R8 R9 R10 R11 R12 R13 R14 R15 R16 R17 R18 R19 R20 R21 R22 R23 R24 R25 R26 R27 R28 R29 R30 R31 R32 R33 R34 R35 R36 R37 R38 R39 R40 R41 R42 R43 R44 R45 R46 R47 R49 R50 R51 R52 R53 R54 R55 R58 R61 R65 R66: library part "Tro 0805 1% 10k", "Dán", Chung_Loai=Dán, Don_Vi=Con, Ma_Hang=MH005473, So_Chan=2, Ten_Linh_Kien="Trở 0805 1% 10k"
R48: library part "Tro 0805 5% 120R", "Dán", Chung_Loai=Dán, Don_Vi=Con, Ma_Hang=MH005253, So_Chan=2, Ten_Linh_Kien="Trở 0805 5% 120R"
R56 R57: library part "Tro 0805 5% 4.7k", "Dán", Chung_Loai=Dán, Don_Vi=Con, Ma_Hang=MH005307, So_Chan=2, Ten_Linh_Kien="Trở 0805 5% 4.7k"
R59 R60: library part "Tro 0805 5% 20k", "Dán", Chung_Loai=Dán, Don_Vi=Con, Ma_Hang=MH005247, So_Chan=2, Ten_Linh_Kien="Trở 0805 5% 20k"
R62 R63 R64: library part "Tro 0805 5% 100R", "Dán", Chung_Loai=Dán, Don_Vi=Con, Ma_Hang=MH005251, So_Chan=2, Ten_Linh_Kien="Trở 0805 5% 100R"
U2 U3 U4 U5 U6 U7 U8 U9 U10 U11 U12 U13 U14 U15 U16 U17 U18 U19 U20 U21 U22 U23 U24: "Single Opto"
U25: "ESP8266 12 22 Pin", IC=ESP8266-EX, Vendor=Ai-thinker
Y1: library part "Thach Anh 2 chan Cam", "Crystal For all Crystal 2pin."
BT2: Ma_Hang=MH001036, Ten="Nút Nhấn 2 Chân 3x6x2.5MM SMD"

## Free pads (board coordinates)
  rect 78.74x98.43 hole 55.12: 1(1195,4600) 1(2025,4600) 2(1395,4600) 2(2225,4600) 3(1595.5,4600) 3(2425,4600) 4(1795,4600) 4(2625,4600)

## Via types
v1: diameter 20, hole 10, Top Layer to Bottom Layer, 63 vias
v2: diameter 50, hole 28, Top Layer to Bottom Layer, 54 vias
v3: diameter 50, hole 28, Top Layer to Int1 (GND), 44 vias
v4: diameter 30, hole 15, Top Layer to Int1 (GND), 29 vias
v5: diameter 30 (per signal layer), hole 15, Top Layer to Int2 (PWR), 19 vias
v6: diameter 50 (per signal layer), hole 28, Top Layer to Int2 (PWR), 15 vias
v7: diameter 30, hole 15, Top Layer to Bottom Layer, 10 vias
v8: diameter 50, hole 50, Top Layer to Bottom Layer, 2 vias
v9: diameter 20 (per signal layer), hole 10, Top Layer to Int2 (PWR), 1 vias
v10: diameter 50, hole 28, Top Layer to Int2 (PWR), 1 vias

## Nets (pads, with @x,y where several pads share a name; then routed paths per layer and width w, separated by ;. In a path a pad name is that pad's centre, name@x,y a point inside that pad or via, vN(x,y) a via of type N, cw(c..) or ccw(c..) an arc to the next point about the centre after c; other vN are vias at no path point)
3V3: AMS1.2 AMS1.4 C1.1 C2.1 C3.1 C4.1 C5.1 C6.1 C7.1 C8.1 C19.1 C20.2 IC3.8 JP2.1 JP2.6 JP10.4 L4.1 R15.2 R16.2 R17.2 R18.2 R19.2 R20.2 R21.2 R22.2 R23.2 R24.2 R25.2 R26.2 R27.2 R49.1 R50.1 R51.1 R52.1 U1.22 U1.50 U1.75 U1.100 U25.8 | length 4119.2
  Top Layer w10: U1.75@2975.87,2828.78 2976.21,2829.13 3003.07,2829.13 3030,2856.05 v1(3030,2900) ; v1(3010,3370) 3042.94,3370 U1.50@3043.78,3369.16 ; C5.1@3319.4,2642.31 3320,2642.91 v1(3320,2700) ; v1(3440,2820) 3490,2820 3515.87,2794.13 3515.87,2761.21 U1.100@3516.22,2760.87 ; U1.22@3584.13,3242.17 3742.83,3242.17 v1(3780,3205)
  Top Layer w20: R52.1@1182.23,3007.39 1182.38,3007.24 1182.38,3003.31 1230.68,2955 1315,2955 1335.83,2975.83 1335.83,2996.17 R51.1@1349.46,3009.79 1349.71,3010.04 1409.39,3010.04 v5(1409.64,3010.29) ; v5(1235,3885) 1272.39,3847.61 R49.1@1327.77,3847.61 1327.77,3851.54 1398.46,3922.23 R50.1@1482.61,3922.23 ; v5(1587.53,2934.77) 1587.38,2934.92 1587.38,3009.98 C7.1@1587.23,3010.13 1587.23,3014.07 1600.85,3027.69 1602.69,3027.69 1637.03,3062.03 1637.03,3121.68 U25.8@1639.96,3124.61 1640.12,3124.77 v5(1722.53,3124.77) ; v5(2749.4,2904.4) 2750.81,2905.81 2818.45,2905.81 C4.1@2819.87,2907.23 2819.87,2964.87 v1(2860,3005) ; v5(2805.77,3360.16) 2806.81,3361.19 2873.83,3361.19 v1(2874.87,3362.23) ; C5.1@3317.23,2640.13 3318.31,2639.05 3318.31,2560.49 v6(3319.4,2559.4) ; v1(3780,3340) 3765.85,3354.15 3728.76,3354.15 C3.1@3715.13,3367.77 3723.12,3375.76 3760.76,3375.76 3780,3395 v9(3780,3445) ; JP10.4@4200,2325 4319.8,2325 C8.1@4320,2325.2 ; IC3.8@4335,2841.22 4335,2785 v6@4355,2765 ; L4.1@4480,1400 v6(4555,1400) ; R15.2@4647.61,3767.43 4653.63,3773.45 4693.45,3773.45 4748.61,3828.61 4766.24,3828.61 4779.93,3842.3 4779.93,3904.93 v5(4780,3905)
  Top Layer w40: C20.2@4477.57,1924.87 4477.57,1928.8 4481.93,1933.16 C1.1@4481.93,2080 4483.46,2081.54 4483.46,2173.46 v6(4485,2175) ; C19.1@4478.79,1706.21 C19.1@4480,1705 ; v2(4800,1820) 4801.91,1821.91 4801.91,1828.8 4892.28,1919.17 AMS1.4@4910,1919.17 AMS1.2@4910,1690.83
  Bottom Layer w10: v1(3320,2700) v1(3440,2820)
  Bottom Layer w20: v1(2860,3005) 2925,3005 v1(3030,2900) ; v1(2874.87,3362.23) 2882.64,3370 v1(3010,3370) ; v1(3780,3205) v1(3780,3340)
  Bottom Layer w40: C19.1@4480,1705 4595,1820 v2(4800,1820)
  other v5: 4445,3765 2222.61,3767.43 2427.61,3767.43 2627.61,3767.43 2837.61,3767.43 3032.61,3767.43 3237.61,3767.43 3437.61,3767.43 3632.61,3767.43 3842.61,3767.43 4042.61,3767.43 4242.61,3767.43
  other v6: 4370,2750
5V: AMS1.3 C16.1 C17.2 IC1.16 IC2.8 L3.2 pad.1@1195,4600 U26.4 | length 12901.4
  Top Layer w40: IC2.8@1320,4335 1320,4350 1195,4475 pad.1@1195,4600 1195,4609.84 1214.37,4629.21 1224.21,4629.21 1305,4710 4840,4710 5435,4115 5435,2155 5287.43,2007.43 C17.2@5287.43,1920.13 5287.43,1916.2 C17.2@5286.76,1915.54 ; U26.4@4730,785 4840,785 v2(4890,835) ; AMS1.3@5000.55,1690.83 5062.06,1690.83 C17.2@5286.76,1915.54 ; L3.2@5265,1310 5274.57,1319.57 5274.57,1673.46 C16.1@5286.1,1685 5286.76,1685.66 C17.2@5286.76,1915.54
  Bottom Layer w40: IC2.8@1320,4335 1320,4320 1020,4020 1020,2745 1120,2645 1670,2645 1725,2590 2046.57,2590 2070,2613.43 2070,3165 2260,3355 IC1.16@2275,3355 ; v2(4890,835) 4890,1340 4945,1395 5180,1395 L3.2@5265,1310
24V: C18.24 IC4.8 JDC.1 R29.2 R31.2 R33.2 R35.2 R37.2 R39.2 R41.2 R43.2 R45.2 R47.2 U26.1 | length 3920.5
  Top Layer w20: v10(1625,1700) 1626.3,1698.7 1706.12,1698.7 R29.2@1707.43,1697.39 ; v6(1875,1700) 1876.3,1698.7 1956.12,1698.7 R31.2@1957.43,1697.39 ; v6(2120,1700) 2121.3,1698.7 2206.12,1698.7 R33.2@2207.43,1697.39 ; v6(2370,1700) 2371.3,1698.7 2456.12,1698.7 R35.2@2457.43,1697.39 ; v6(2625,1700) 2626.3,1698.7 2711.12,1698.7 R37.2@2712.43,1697.39 ; v6(2875,1700) 2876.3,1698.7 2956.12,1698.7 R39.2@2957.43,1697.39 ; v6(3130,1700) 3131.3,1698.7 3211.12,1698.7 R41.2@3212.43,1697.39 ; v6(3380,1695) 3381.2,1696.2 3456.23,1696.2 R43.2@3457.43,1697.39 ; v6(3630,1700) 3631.3,1698.7 3706.12,1698.7 R45.2@3707.43,1697.39 ; v6(3880,1695) 3881.2,1696.2 3956.23,1696.2 R47.2@3957.43,1697.39 ; IC4.8@4460,3245 v6(4510,3245)
  Top Layer w40: JDC.1@4330,1155 4350,1175 4587.4,1175 4692.4,1280 C18.24@4733.74,1280 ; U26.1@4730,995 4720.31,995 4720,995.31 4720,1266.26 C18.24@4733.74,1280 ; v6(5160,3235) 5320,3075 5320,2700 4715,2095 4715,1298.74 C18.24@4733.74,1280
A_IN1: IC3.1 IC3.2 U1.23 | length 1167.5
  Top Layer w10: U1.23@3584.13,3261.85 3863.15,3261.85 v7(3940,3185)
  Top Layer w20: v7(4055,2960) 4056.91,2958.09 4056.91,2920.49 4333.82,2643.58 4333.82,2619.96 IC3.1@4335,2618.78 IC3.2@4385,2618.78
  Bottom Layer w20: v7(3940,3185) 3985,3140 3985,3085 4055,3015 v7(4055,2960)
A_IN2: IC3.6 IC3.7 U1.24 | length 1049.5
  Top Layer w10: U1.24@3584.13,3281.54 3903.46,3281.54 v7(3945,3240)
  Top Layer w20: v7(4174,3080) 4175.91,3078.09 4175.91,3073.93 4385,2864.84 IC3.7@4385,2841.22 IC3.6@4435,2841.22
  Bottom Layer w20: v7(3945,3240) 4014,3240 v7(4174,3080)
A_OUT1: IC4.3 U1.29 | length 1139.9
  Top Layer w10: U1.29@3457.17,3369.13 3457.17,3437.17 3485,3465
  Top Layer w20: 3485,3465 3625,3605 4295,3605 4360,3540 IC4.3@4360,3467.44
A_OUT2: IC4.5 U1.30 | length 2217.4
  Top Layer w10: U1.30@3437.48,3369.13 3437.48,3477.48 3455,3495
  Top Layer w20: 3455,3495 3634.78,3674.78 4519.78,3674.78 v7(4520,3675) ; IC4.5@4310,3245 4310,3120 4355,3075 v7(4420,3075)
  Bottom Layer w20: v7(4420,3075) 4580,3235 4580,3615 v7(4520,3675)
AIN1: P6.2 R54.2 | length 236.9
  Top Layer w20: R54.2@4887.39,2702.57 5092.57,2702.57 P6.2@5115,2725
AIN2: P6.1 R55.2 | length 230
  Top Layer w20: R55.2@4885,2925 P6.1@5115,2925
BOOT0: R65.1 U1.94 | length 1931.1
  Top Layer w10: U1.94@3398.11,2760.87 3398.11,2639.6 3405,2632.71 v1(3405,2630)
  Top Layer w20: v7(4040,3125) 4040.2,3125.2 R65.1@4040.2,3185 ; v7(4110,3000) 4025,3000 3995,2970 3995,2604.69 v1(4115.9,2483.8)
  Bottom Layer w20: v1(3405,2630) 3730,2305 3937.1,2305 v1(4115.9,2483.8) ; v7(4040,3125) 4040,3070 v7(4110,3000)
BOOT1: R66.2 U1.37 | length 824.3
  Top Layer w10: U1.37@3299.69,3369.13 3300.03,3369.48 3300.03,3396.34 3378.09,3474.4 3378.09,3478.09 v1(3380,3480)
  Top Layer w20: v1(3645,3440) 3630,3425 3630,3355 3680,3305 3855.87,3305 3896.06,3345.2 R66.2@3900,3345.2
  Bottom Layer w20: v1(3380,3480) 3605,3480 v1(3645,3440)
COM_RX: COM1.2 IC1.13 | length 1380.2
  Bottom Layer w20: COM1.2@1471.81,2192.36 1484.31,2192.36 1791.95,2500 2080,2500 2162.82,2582.82 2162.82,2957.82 2260,3055 IC1.13@2275,3055
COM_TX: COM1.3 IC1.14 | length 1405.7
  Bottom Layer w20: COM1.3@1471.81,2301.42 1484.31,2301.42 1722.89,2540 2070,2540 2120,2590 2120,3015 2260,3155 IC1.14@2275,3155
DE: IC2.3 U1.46 | length 2813.2
  Top Layer w10: 2855,3475 2872,3458 3069.88,3458 3122.17,3405.71 3122.17,3369.48 U1.46@3122.52,3369.13
  Top Layer w20: v1(1875,3765) 1875,3730 2005,3600 2730,3600 2855,3475
  Bottom Layer w20: IC2.3@1520,4035 1520,4050 1410,4160 1300,4160 1175,4035 1175,3880 1255,3800 1840,3800 v1(1875,3765)
DI: IC2.4 U1.47 | length 1830.5
  Top Layer w10: 2805,3465 2828,3442 3063.25,3442 3102.49,3402.77 3102.49,3369.48 U1.47@3102.83,3369.13
  Top Layer w20: IC2.4@1620,4020 1810.94,3829.06 1810.94,3729.06 1980,3560 2710,3560 2805,3465
DI_1: R15.1 U1.98 U2.4 | length 2691.7
  Top Layer w10: U1.98@3476.85,2760.87 3477.2,2760.52 3477.2,2722.8 3506,2694 3656.65,2694 3657.65,2695 v1(3805,2695)
  Top Layer w20: U2.4@4645,4072.68 v2(4645,4160)
  Top Layer w40: U2.4@4645,4072.68 4646.3,4071.37 4646.3,3843.53 R15.1@4647.61,3842.23
  Bottom Layer w20: v1(3805,2695) 4115,2695 4645,3225 v2(4645,4160)
DI_2: R16.1 U1.1 U3.4 | length 2373.4
  Top Layer w10: U1.1@3584.13,2828.78 3606.77,2828.78 3685,2750.55 3850.55,2750.55 v1(3855,2755)
  Top Layer w20: U3.4@4444.35,4068.33 v2(4444.35,4155.65)
  Top Layer w40: R16.1@4445,3839.8 U3.4@4445,4067.68
  Bottom Layer w20: v1(3855,2755) 4040,2755 4444.35,3159.35 v2(4444.35,4155.65)
DI_3: R17.1 U1.2 U4.4 | length 2157.6
  Top Layer w10: U1.2@3584.13,2848.46 3584.48,2848.12 3836.88,2848.12 v1(3840,2845)
  Top Layer w20: U4.4@4244.35,4068.33 v2(4244.35,4155.65)
  Top Layer w40: R17.1@4242.61,3842.23 4243.8,3843.43 4243.8,4066.48 U4.4@4245,4067.68
  Bottom Layer w20: v1(3840,2845) 4025,2845 4205,3025 4205,4108.94 4244.35,4148.28 v2(4244.35,4155.65)
DI_4: R18.1 U1.3 U5.4 | length 1898
  Top Layer w10: U1.3@3584.13,2868.15 3768.15,2868.15 v1(3825,2925)
  Top Layer w20: U5.4@4043.15,4067.13 v2(4043.15,4154.45)
  Top Layer w40: R18.1@4042.61,3842.23 4043.8,3843.43 4043.8,4066.48 U5.4@4045,4067.68
  Bottom Layer w20: v1(3825,2925) 3895,2995 3895,3645 4043.15,3793.15 v2(4043.15,4154.45)
DI_5: R19.1 U1.4 U6.4 | length 1765.3
  Top Layer w10: U1.4@3584.13,2887.83 3712.83,2887.83 v1(3845,3020)
  Top Layer w20: U6.4@3844.35,4068.33 v2(3844.35,4155.65)
  Top Layer w40: R19.1@3842.61,3842.23 3843.8,3843.43 3843.8,4066.48 U6.4@3845,4067.68
  Bottom Layer w20: v2(3844.35,4155.65) 3844.35,3020.65 v1(3845,3020)
DI_6: R20.1 U1.5 U7.4 | length 1773
  Top Layer w10: U1.5@3584.13,2907.52 3584.48,2907.87 3653.87,2907.87 v1(3795,3049)
  Top Layer w20: U7.4@3634.35,4068.33 v2(3634.35,4155.65)
  Top Layer w40: R20.1@3632.61,3842.23 3633.8,3843.43 3633.8,4066.48 U7.4@3635,4067.68
  Bottom Layer w20: v2(3634.35,4155.65) 3634.35,3665.65 3815,3485 3815,3069 v1(3795,3049)
DI_7: R21.1 U1.38 U8.4 | length 1163.9
  Top Layer w10: U1.38@3280,3369.13 3280,3444.7 3435,3599.7 v1(3435,3600)
  Top Layer w20: U8.4@3435,4067.68 v2(3435,4155)
  Top Layer w40: U8.4@3435,4067.68 3436.3,4066.37 3436.3,3843.53 R21.1@3437.61,3842.23
  Bottom Layer w20: v1(3435,3600) v2(3435,4155)
DI_8: R22.1 U1.39 U9.4 | length 1110.2
  Top Layer w10: v1(3260,3535) 3260.16,3534.84 3260.16,3369.29 U1.39@3260.32,3369.13
  Top Layer w20: U9.4@3235,4067.68 v2(3235,4155) ; R22.1@3236.3,3843.53 R22.1@3237.61,3842.23
  Top Layer w40: U9.4@3235,4067.68 3236.3,4066.37 R22.1@3236.3,3843.53
  Bottom Layer w20: v2(3235,4155) 3235,3568.12 3260,3543.12 v1(3260,3535)
DI_9: R23.1 U1.40 U10.4 | length 1184.8
  Top Layer w10: v1(3100,3595) 3240.63,3454.37 U1.40@3240.63,3369.13
  Top Layer w20: U10.4@3035,4067.68 v2(3035,4155)
  Top Layer w40: R23.1@3032.61,3842.23 3033.8,3843.43 3033.8,4066.48 U10.4@3035,4067.68
  Bottom Layer w20: v2(3035,4155) 3035,3660 v1(3100,3595)
DI_10: R24.1 U1.41 U11.4 | length 1320
  Top Layer w10: v1(2955,3675) 2984,3646 2995.02,3646 3220.6,3420.42 3220.6,3369.48 U1.41@3220.94,3369.13
  Top Layer w20: U11.4@2835,4067.68 v2(2835,4160) ; R24.1@2836.3,3843.53 R24.1@2837.61,3842.23
  Top Layer w40: U11.4@2835,4067.68 2836.3,4066.37 R24.1@2836.3,3843.53
  Bottom Layer w20: v2(2835,4160) 2835,3720 2880,3675 v1(2955,3675)